# Altium PCB driver4ch.PcbDoc
Units mm, origin at the board's own origin, x right, y up, seen from the top; angles counter-clockwise.
Board outline 140 x 27.5 mm, 2 copper layers (Top Layer, Bottom Layer); 59 components, 34 nets, 158 pads, 0 vias.
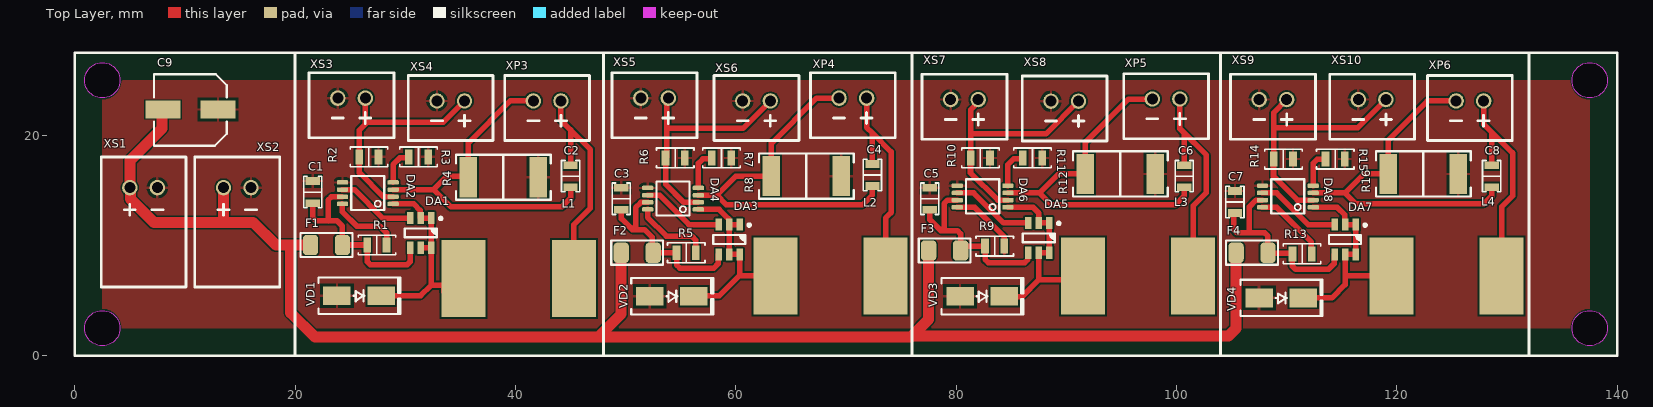
[diagram p0: Top Layer view]
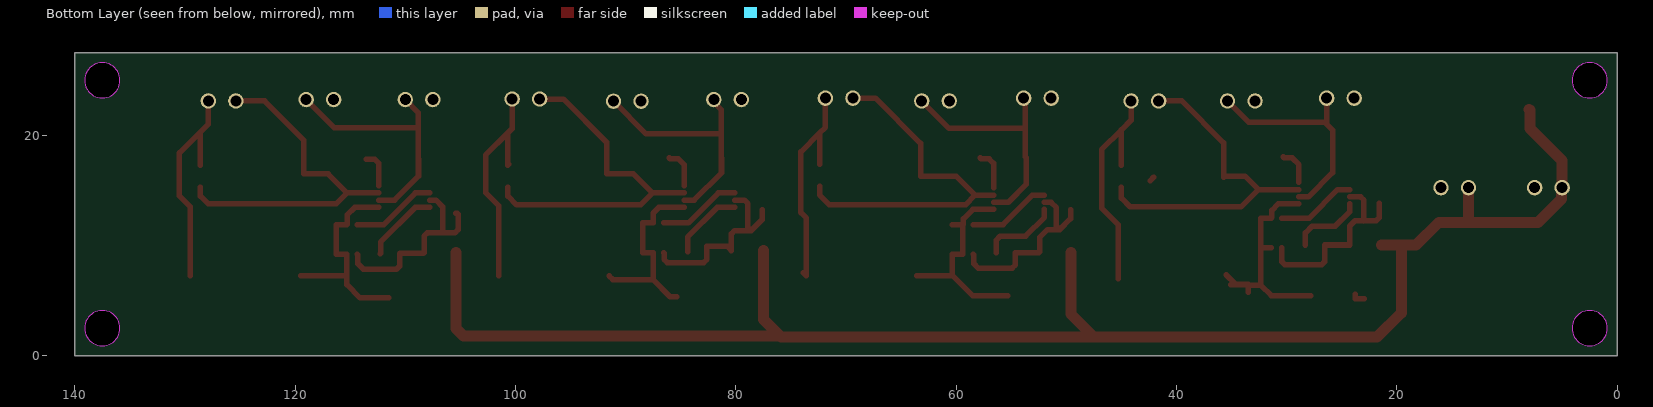
[diagram p1: Bottom Layer view, seen from below]
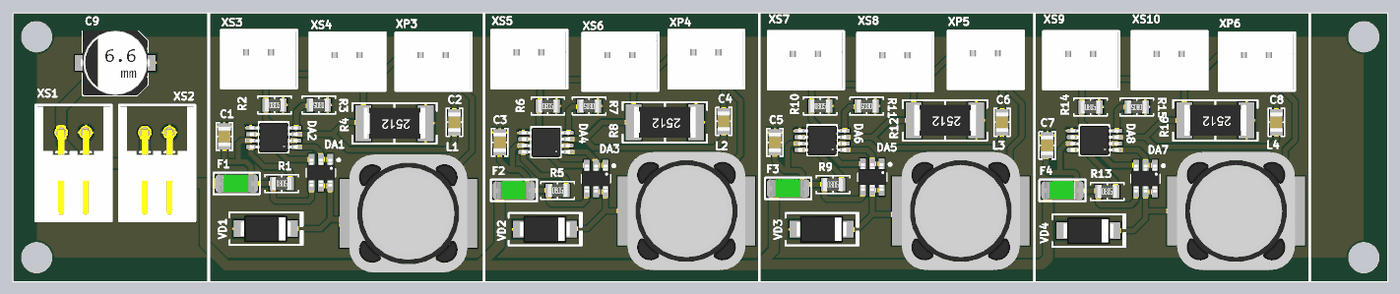
[diagram p2: 3D render of the assembled board from above, using the file's embedded part models]

## Layer stack, top to bottom
Top Solder: solder mask 0.0102, Solder Resist, Dk 3.5
Top Layer: signal copper 0.0356
Dielectric 1: dielectric 0.32, FR-4, Dk 4.8
Bottom Layer: signal copper 0.0356
Bottom Solder: solder mask 0.0102, Solder Resist, Dk 3.5

## Board outline
0,0 140,0 140,27.5 0,27.5
cut-out: 2.5,26.6 cw(c2.5,25) 4.1,25 cw(c4.1,25) 4.1,25 cw(c2.5,25) 2.5,23.4 cw(c2.5,25) 0.9,25 cw(c0.9,25) 0.9,25 cw(c2.5,25)
cut-out: 2.5,4.1 cw(c2.5,2.5) 4.1,2.5 cw(c4.1,2.5) 4.1,2.5 cw(c2.5,2.5) 2.5,0.9 cw(c2.5,2.5) 0.9,2.5 cw(c0.9,2.5) 0.9,2.5 cw(c2.5,2.5)
cut-out: 137.5,4.1 cw(c137.5,2.5) 139.1,2.5 cw(c139.1,2.5) 139.1,2.5 cw(c137.5,2.5) 137.5,0.9 cw(c137.5,2.5) 135.9,2.5 cw(c135.9,2.5) 135.9,2.5 cw(c137.5,2.5)
cut-out: 137.5,26.6 cw(c137.5,25) 139.1,25 cw(c139.1,25) 139.1,25 cw(c137.5,25) 137.5,23.4 cw(c137.5,25) 135.9,25 cw(c135.9,25) 135.9,25 cw(c137.5,25)

## Design rules (kind name [scope] priority, off if disabled: settings)
Clearance "Clearance 3 Oz" [All] p1: gap=0.15 ignorepadtopadclearanceinfootprint=FALSE
PolygonConnect [All] p1: connectstyle=Relief reliefconductorwidth=0.254 reliefentries=4 polygonreliefangle="90 Angle" airgapwidth=0.254
RoutingVias [All] p1: holewidth=0.711 width=1.27 viastyle="Through Hole" minholewidth=0.711 minwidth=1.27 maxholewidth=0.711 maxwidth=1.27
SolderMaskExpansion [All] p1: expansion=0.102 istentingtop=FALSE
Width "Width 3 Oz" [All] p1: maxlimit=10 minlimit=0.35 preferedwidth=0.5 minimp=50.000000 maximp=50.000000 favimp=50.000000 checkconnectedcopper=TRUE
30 further rules are at their usual default settings.

## Components (designator, comment, footprint, x,y, rotation, side; value= is the part's Value field where it differs from the comment)
C1 "2.2 µF" "CAP 0805_2012 RF" 21.6,14.85 r270 top
C2 "10 nF" "CAP 0805_2012 RF" 45,16.3 r90 top
C3 "2.2 µF" "CAP 0805_2012 RF" 49.6,14.25 r270 top
C4 "10 nF" "CAP 0805_2012 RF" 72.4,16.4 r90 top
C5 "2.2 µF" "CAP 0805_2012 RF" 77.6,14.25 r270 top
C6 "10 nF" "CAP 0805_2012 RF" 100.7,16.3 r90 top
C7 "2.2 µF" "CAP 0805_2012 RF" 105.3,13.95 r270 top
C8 "10 nF" "CAP 0805_2012 RF" 128.6,16.3 r90 top
C9 "10 µF" "CAP ALSMD 6.6MM H5.4MM" 10.5,22.35 r180 top
DA1 "FDC658AP" "TI TSOT-23-6" 31.4,11.15 r270 top
DA2 "LM3401" MSOP8 26.6,14.75 r180 top
DA3 "FDC658AP" "TI TSOT-23-6" 59.4,10.55 r270 top
DA4 "LM3401" MSOP8 54.3,14.25 r180 top
DA5 "FDC658AP" "TI TSOT-23-6" 87.5,10.7 r270 top
DA6 "LM3401" MSOP8 82.4,14.45 r180 top
DA7 "FDC658AP" "TI TSOT-23-6" 115.3,10.55 r270 top
DA8 "LM3401" MSOP8 110.1,14.45 r180 top
F1 "2 A" 1206_fusE 21.4,10.05 r0 top
F2 "2 A" 1206_fusE 49.6,9.35 r0 top
F3 "2 A" 1206_fusE 77.5,9.55 r0 top
F4 "2 A" 1206_fusE 105.4,9.35 r0 top
L1 "33 µH" INDUCTOR_1208 40.3,7 r0 top
L2 "33 µH" INDUCTOR_1208 68.6,7.25 r0 top
L3 "33 µH" INDUCTOR_1208 96.5,7.25 r0 top
L4 "33 µH" INDUCTOR_1208 124.5,7.25 r0 top
R1 "43 kΩ" "RES 0805_2012" 27.425,10.05 r0 top
R2 "100 kΩ" "RES 0805_2012" 26.7,18.05 r0 top
R3 "5.6 kΩ" "RES 0805_2012" 31.2,18.05 r180 top
R4 "0.3 Ω" "RES 2512_6432" 38.9,16.2 r180 top
R5 "43 kΩ" "RES 0805_2012" 55.5,9.35 r0 top
R6 "100 kΩ" "RES 0805_2012" 54.5,17.95 r0 top
R7 "5.6 kΩ" "RES 0805_2012" 58.7,17.95 r180 top
R8 "0.3 Ω" "RES 2512_6432" 66.4,16.3 r180 top
R9 "43 kΩ" "RES 0805_2012" 83.5,9.95 r0 top
R10 "100 kΩ" "RES 0805_2012" 82.2,17.95 r0 top
R11 "5.6 kΩ" "RES 0805_2012" 86.927,17.95 r180 top
R12 "0.3 Ω" "RES 2512_6432" 94.9,16.5 r180 top
R13 "43 kΩ" "RES 0805_2012" 111.4,9.25 r0 top
R14 "100 kΩ" "RES 0805_2012" 109.7,17.85 r0 top
R15 "5.6 kΩ" "RES 0805_2012" 114.4,17.85 r180 top
R16 "0.3 Ω" "RES 2512_6432" 122.4,16.5 r180 top
VD1 "SS34" "DO214AC SMA" 25.8,5.45 r0 top
VD2 "SS34" "DO214AC SMA" 54.2,5.4 r0 top
VD3 "SS34" "DO214AC SMA" 82.352,5.403 r0 top
VD4 "SS34" "DO214AC SMA" 109.5,5.25 r0 top
XP3 "WB-02" MW-2M 42.627,22.823 r270 top
XP4 "WB-02" MW-2M 70.373,23.077 r270 top
XP5 "WB-02" MW-2M 98.8,23 r270 top
XP6 "WB-02" MW-2M 126.373,22.823 r270 top
XS1 "WK-02R" CWF_2R 7.5,14.25 r270 top
XS2 "WK-02R" CWF_2R 16,14.25 r270 top
XS3 "WB-02" MW-2M 24.873,23.077 r270 top
XS4 "WB-02" MW-2M 33.873,22.823 r270 top
XS5 "WB-02" MW-2M 52.373,23.077 r270 top
XS6 "WB-02" MW-2M 61.627,22.823 r270 top
XS7 "2-pin socket" MW-2M 80.5,22.95 r270 top
XS8 "2-pin socket" MW-2M 89.6,22.8 r270 top
XS9 "2-pin socket" MW-2M 108.5,22.95 r270 top
XS10 "2-pin socket" MW-2M 117.5,22.95 r270 top

## Footprints (in the part's own frame and the unit in brackets; to place one, negate y for a bottom-side part, rotate by r counter-clockwise, add the part's x,y. Pads: shape width x height; smd on the part's side, far side on the other; paste and mask are expansions set on the pad)
1206_fusE [mm]
  rrect50% 1.4x1.85 smd: 1(0,0) 2(2.9,0)
  silkscreen extent -0.9,-1.1 3.8,1.1, body extent -0.35,-0.92 3.15,0.92, height 0.5
"CAP 0805_2012 RF" [mm] "Chip Capacitor, 2-Leads, Body 2.00x1.20mm, IPC High Density"
  rect 0.7x1.3 smd: 1(-1,0) 2(1,0)
  silkscreen extent -1.43,-0.82 1.43,0.82, body extent -1,-0.64 1,0.64, height 1.26
"CAP ALSMD 6.6MM H5.4MM" [mm] "Aluminum Electrolytic Capacitor, Body 6.60x6.60x5.40mm, IPC Low Density"
  rect 3.2x1.6 smd: 1(-2.5,0) 2(2.5,0)
  silkscreen extent -3.3,-3.2 3.3,3.3, body extent -3.5,-3.3 3.5,3.3, height 5.4
CWF_2R [mm]
  round 1.4 hole 1: 1(-1,-2.5) 2(-1,0)
  silkscreen extent -3.8,-5.1 8,2.6, body extent -3.62,-5 7.88,2.5, height 5.75
"DO214AC SMA" [mm] "Molded Diode, 2-Leads, Body 4.30x2.60mm, IPC Medium Density"
  rect 2.5x1.7 smd: 1(-2,0) 2(2,0)
  silkscreen extent -3.68,-1.65 3.75,1.65, body extent -2.6,-1.37 2.6,1.37, height 2.4
INDUCTOR_1208 [mm]
  rect 4x7 smd: 1(-5,0) 2(5,0)
  body extent -6,-6 6,6, height 7.46
MSOP8 [mm]
  rrect50% 1.02x0.41 smd: 1(-2.3,0.975) 2(-2.3,0.325) 3(-2.3,-0.325) 4(-2.3,-0.975) 5(2.3,-0.975) 6(2.3,-0.325) 7(2.3,0.325) 8(2.3,0.975)
  silkscreen extent -1.5,-1.57 1.5,1.53, body extent -2.46,-1.49 2.44,1.51, height 1.15
MW-2M [mm]
  round 1.4 hole 1: 1(-0.3,1.5) 2(-0.3,-1)
  silkscreen extent -2.6,-3.6 3.3,4.1, body extent -2.5,-3.55 3.2,3.95, height 7
"RES 0805_2012" [mm] "Chip Resistor, 2-Leads, Body 2.00x1.25mm, IPC Medium Density"
  rect 0.7x1.35 smd: 1(-0.875,0) 2(0.875,0)
  silkscreen extent -1.7,-0.9 1.7,0.9, body extent -1,-0.62 1,0.63, height 0.6
"RES 2512_6432" [mm] "Chip Resistor, 2-Leads, Body 6.30x3.15mm, IPC Medium Density"
  rect 1.6x3.65 smd: 1(-3.175,0) 2(3.175,0)
  silkscreen extent -4.3,-2.05 4.3,2.05, body extent -3.15,-1.57 3.15,1.57, height 0.7
"TI TSOT-23-6" [mm] "TSOT23, 6-Leads, Body 2.90x2.80mm, Pitch 0.95mm, IPC High Density"
  rrect1% 1.1x0.6 smd: 1(-1.35,0.95) 2(-1.35,0) 3(-1.35,-0.95) 4(1.35,-0.95) 5(1.35,0) 6(1.35,0.95)
  silkscreen extent -1.43,-1.45 0.4,1.94, body extent -1.4,-1.45 1.4,1.45, height 1.1

## Part data
C1 C3 C5 C7: library part C_NonPolarized, "Ceramic capacitor, 50 V, 10%"
C2 C4 C6 C8: library part C_NonPolarized, "Ceramic capacitor, 250 V, 10%"
C9: library part C_Polarized, "Aluminum electrolytic capacitor, 50 V, 20%"
DA1 DA3 DA5 DA7: library part VT_FDC658AP, "P-channel power MOSFET"
DA2 DA4 DA6 DA8: library part DA_LM3401, "Hysteretic LED driver controller"
F1 F2 F3 F4: library part F_Fuse, "Surface-mount fuse, 63 V"
L1 L2 L3 L4: library part L_Inductor, "Shielded power inductor, 15%"
R1 R2 R3 R5 R6 R7 R9 R10 R11 R13 R14 R15: library part R_Resistor, "Chip resistor, 0.125 W"
R4 R8 R12 R16: library part R_Resistor, "Current-sense resistor, 1 W, 1%"
VD1 VD2 VD3 VD4: library part VD_Schottky, "Schottky rectifier, 3 A, 40 V"
XP3 XP4 XP5 XP6: library part XP_Connector_2Pin, "2-pin connector (plug)"
XS1 XS2 XS3 XS4 XS5 XS6 XS7 XS8 XS9 XS10: library part XS_Connector_2Pin, "2-pin connector (socket)"

## Nets (pads, with @x,y where several pads share a name; then routed paths per layer and width w, separated by ;. In a path a pad name is that pad's centre, name@x,y a point inside that pad or via, vN(x,y) a via of type N, cw(c..) or ccw(c..) an arc to the next point about the centre after c; other vN are vias at no path point)
NetC1_1: C1.1 C3.1 C5.1 C7.1 C9.1 DA2.5 DA4.5 DA6.5 DA8.5 R2.2 R3.1 R4.1 R6.2 R7.1 R8.1 R10.2 R11.1 R12.1 R14.2 R15.1 R16.1 VD1.1 VD2.1 VD3.1 VD4.1 XS1.2 XS2.2 XS3.2 XS4.2 XS5.2 XS6.2 XS7.2 XS8.2 XS9.2 XS10.2 | length 1.9
  Top Layer w0.5: XS1.2 XS1.2@7.5,15.494 ; VD1.1@22.982,5.168 23.8,5.168 VD1.1 VD1.1@23.8,5.568 ; R4.1 R4.1@42.407,15.868
NetC1_2: C1.2 DA1.4 DA2.7 F1.2 R1.1 | length 18.5
  Top Layer w0.5: C1.2 21.6,12.543 21.893,12.25 22.996,12.25 ; DA2.7 23.293,14.425 23,14.132 23,12.254 22.996,12.25 ; DA1.4 30.45,8.543 30.157,8.25 26.843,8.25 26.55,8.543 R1.1 F1.2 24.3,11.75 23.8,12.25 22.996,12.25
NetC2_1: C2.1 DA2.3 R4.2 XP3.2 | length 32.4
  Top Layer w0.5: DA2.3 32.575,15.075 ; XP3.2 39.523,23.123 35.725,19.325 R4.2 35.625,16.3 33.8,16.3 32.575,15.075 ; C2.1 45,14.3 44.2,13.5 34.15,13.5 32.575,15.075
NetC2_2: C2.2 L1.2 XP3.1 | length 21.1
  Top Layer w0.5: XP3.1 44.127,21.373 45,20.5 ; C2.2 45,20.5 ; L1.2 45.3,11.9 46.8,13.4 46.8,18.7 45,20.5
NetC3_2: C3.2 DA3.4 DA4.7 F2.2 R5.1 | length 17.3
  Top Layer w0.5: C3.2 49.607,13.243 49.607,12.443 50.6,11.45 ; DA4.7 51.375,13.925 50.9,13.45 50.9,11.75 50.6,11.45 ; DA3.4 58.4,9.15 58.4,8.35 58,7.95 54.918,7.95 54.625,8.243 R5.1 F2.2 52.418,9.432 52.418,10.732 51.7,11.45 50.6,11.45
NetC4_1: C4.1 DA4.3 R8.2 XP4.2 | length 33.8
  Top Layer w0.5: DA4.3 58.275,14.575 ; XP4.2 67.327,23.377 63.225,19.275 R8.2 60,16.3 58.275,14.575 ; C4.1 72.393,15.393 72.393,14.593 71.5,13.7 59.15,13.7 58.275,14.575
NetC4_2: C4.2 L2.2 XP4.1 | length 20.5
  Top Layer w0.5: XP4.1 71.873,20.727 72.4,20.2 ; C4.2 72.4,20.2 ; L2.2@73.9,7.55 L2.2 73.6,12.5 74.1,13 74.1,18.5 72.4,20.2
NetC5_2: C5.2 DA5.4 DA6.7 F3.2 R9.1 | length 18
  Top Layer w0.5: C5.2 77.6,12.35 78.6,11.35 ; DA6.7 79.225,14.125 78.9,13.8 78.9,11.65 78.6,11.35 ; DA5.4 86.5,9.3 86.5,8.743 86.207,8.45 82.918,8.45 82.625,8.743 R9.1 80.8,9.95 F3.2 80.4,11.057 80.107,11.35 78.6,11.35
NetC6_1: C6.1 DA6.3 R12.2 XP5.2 | length 33
  Top Layer w0.5: DA6.3 87.575,14.775 ; XP5.2 95.65,23.3 91.725,19.375 R12.2 89.3,16.5 87.575,14.775 ; C6.1 100.693,15.293 100.693,14.493 99.9,13.7 88.65,13.7 87.575,14.775
NetC6_2: C6.2 L3.2 XP5.1 | length 20.6
  Top Layer w0.5: XP5.1 100.3,20.6 100.7,20.2 ; C6.2@100.6,17.4 C6.2 100.7,20.2 ; L3.2 101.5,13.6 102.7,14.8 102.7,18.2 100.7,20.2
NetC7_2: C7.2 DA7.4 DA8.7 F4.2 R13.1 | length 18.7
  Top Layer w0.5: C7.2@105.4,12.95 C7.2 105.2,12.85 105.2,11.443 105.493,11.15 106.6,11.15 ; DA8.7 107.225,14.125 106.6,13.5 106.6,11.15 ; DA7.4 114.3,9.15 114.3,8.35 113.8,7.85 110.796,7.85 110.504,8.143 110.504,9.271 110.475,9.3 108.35,9.3 F4.2 108.3,10.857 108.007,11.15 106.6,11.15
NetC8_1: C8.1 DA8.3 R16.2 XP6.2 | length 33.1
  Top Layer w0.5: DA8.3 115.275,14.775 ; XP6.2 122.773,23.123 119.225,19.575 R16.2 117,16.5 115.275,14.775 ; C8.1 128.593,15.293 128.593,14.493 127.9,13.8 116.25,13.8 115.275,14.775
NetC8_2: C8.2 L4.2 XP6.1 | length 20.3
  Top Layer w0.5: XP6.1 127.873,21.027 128.65,20.25 ; C8.2 128.6,20.2 128.65,20.25 ; L4.2 129.5,13.5 130.5,14.5 130.5,18.4 128.65,20.25
NetC9_2: C9.2 F1.1 F2.1 F3.1 F4.1 XS1.1 XS2.1 | length 147.6
  Top Layer w1: C9.2 7.936,22.286 7.936,20.636 5,17.7 XS1.1 5.077,15.173 5.077,14.223 7.2,12.1 16.2,12.1 18.25,10.05 19.4,10.05 ; 13.5,12.1 XS2.1 ; F1.1 19.4,10.05 ; F2.1 49.6,3.786 47.514,1.7 ; F3.1 77.5,3.3 76,1.8 ; F4.1 105.4,2.486 104.714,1.8 76,1.8 ; 19.4,10.05 19.6,9.85 19.6,3.9 21.8,1.7 47.514,1.7 ; 47.514,1.7 75.9,1.7 76,1.8
NetDA1_1: DA1.1 DA1.2 DA1.5 DA1.6 DA2.1 L1.1 VD1.2 | length 22.9
  Top Layer w0.5: VD1.2 31.4,5.45 32.343,6.393 L1.1@33.5,6.393 ; DA2.1 30.775,13.775 31.35,13.2 31.35,12.55 DA1.2 DA1.1 DA1.6 ; DA1.5 DA1.6 ; 32.35,6.393 DA1.6 ; L1.1@33.5,5.743 33.5,6.45 L1.1@34.643,6.45 ; L1.1@33.5,6.493 33.9,6.493 34.643,6.493 L1.1@35.5,7.35 ; L1.1@33.9,6.45 L1.1@34.643,6.45 ; L1.1@35.1,6.45 L1.1@34.643,6.45
NetDA1_3: DA1.3 DA2.6 | length 7.2
  Top Layer w0.5: DA2.6 25.375,15.075 27.95,12.5 DA1.3
NetDA2_2: DA2.2 R2.1 XS3.1 XS4.1 | length 20.6
  Top Layer w0.5: XS3.1 26.373,21.022 25.825,20.474 R2.1 25.825,16.625 28.025,14.425 DA2.2 ; 26.525,21.175 33.425,21.175 XS4.1
NetDA2_4: DA2.4 R3.2 | length 3.3
  Top Layer w0.5: DA2.4 28.9,17.35 29.518,17.968 30.243,17.968 R3.2
NetDA2_8: DA2.8 R1.2 | length 6.6
  Top Layer w0.5: DA2.8 24.3,13.05 25.6,11.75 27.7,11.75 28.307,11.143 28.307,10.057 R1.2
NetDA3_1: DA3.1 DA3.2 DA3.5 DA3.6 DA4.1 L2.1 VD2.2 | length 19.2
  Top Layer w0.5: VD2.2@55.3,5.45 58.5,5.45 60.3,7.25 L2.1 ; DA4.1 58.489,13.275 59.35,12.414 59.35,11.95 DA3.2 ; 60.35,7.25 DA3.6 DA3.5 DA3.2 ; DA3.1 DA3.2
NetDA3_3: DA3.3 DA4.6 | length 7.6
  Top Layer w0.5: DA4.6 53.075,14.575 55.75,11.9 DA3.3
NetDA4_2: DA4.2 R6.1 XS5.1 XS6.1 | length 22
  Top Layer w0.5: XS5.1 53.725,23.229 53.725,20.64 ; DA4.2 55.275,13.925 53.625,15.575 R6.1 53.725,18.05 53.725,20.64 ; XS6.1 60.644,20.64 53.725,20.64
NetDA4_4: DA4.4 R7.2 | length 3.7
  Top Layer w0.5: DA4.4 56.6,17.45 57.018,17.868 57.743,17.868 R7.2
NetDA4_8: DA4.8 R5.2 | length 7.1
  Top Layer w0.5: DA4.8 52,12.55 53.7,10.85 56,10.85 56.375,10.475 R5.2
NetDA5_1: DA5.1 DA5.2 DA5.5 DA5.6 DA6.1 L3.1 VD3.2 | length 17.9
  Top Layer w0.5: DA6.1 86.975,13.475 87.496,12.954 87.496,12.054 DA5.2 DA5.1 DA5.6 DA5.5 87.5,6.899 ; VD3.2@85.364,5.35 85.951,5.35 87.5,6.899 ; L3.1 91.149,6.899 87.5,6.899
NetDA5_3: DA5.3 DA6.6 | length 7.6
  Top Layer w0.5: DA6.6 81.575,14.775 84.3,12.05 DA5.3
NetDA6_2: DA6.2 R10.1 XS7.1 XS8.1 | length 22.4
  Top Layer w0.5: XS7.1 82,23.006 81.325,22.331 81.325,20.141 ; DA6.2 83.775,14.125 81.3,16.6 81.3,17.925 R10.1 81.325,20.141 ; XS8.1 88.141,20.141 81.325,20.141
NetDA6_4: DA6.4 R11.2 | length 3.5
  Top Layer w0.5: DA6.4 84.7,17.35 85.212,17.862 85.964,17.862 R11.2
NetDA6_8: DA6.8 R9.2 | length 6.7
  Top Layer w0.5: DA6.8 81.675,13.475 84.375,10.775 R9.2@84.375,9.45
NetDA7_1: DA7.1 DA7.2 DA7.5 DA7.6 DA8.1 L4.1 VD4.2 | length 19.9
  Top Layer w0.5: VD4.2 114.1,5.25 115.3,6.45 115.3,7.25 ; DA8.1 114.575,13.475 115.271,12.779 115.271,11.929 DA7.2 DA7.1 DA7.6 DA7.5 115.3,7.25 ; L4.1 115.3,7.25
NetDA7_3: DA7.3 DA8.6 | length 7.7
  Top Layer w0.5: DA8.6 109.075,14.775 111.95,11.9 DA7.3
NetDA8_2: DA8.2 R14.1 XS9.1 XS10.1 | length 23.2
  Top Layer w0.5: XS9.1 108.825,22.075 108.825,20.7 ; DA8.2 110.975,14.125 108.8,16.3 108.8,17.825 R14.1 108.825,20.7 ; XS10.1 116.45,20.7 108.825,20.7
NetDA8_4: DA8.4 R15.2 | length 3.3
  Top Layer w0.5: DA8.4 112.4,17.457 112.793,17.85 R15.2
NetDA8_8: DA8.8 R13.2 | length 6.8
  Top Layer w0.5: DA8.8 109.075,13.475 112.245,10.305 112.245,9.28 R13.2

## Polygon pours and split planes (outlines as drawn)
NetC1_1 on Top Layer "NETC1_1_L01_P000" (solid, pour order 0): 2.5,25 2.5,2.5 137.5,2.5 137.5,25

## Silkscreen, mask and mechanical layers (free items; w line width, h text height)
Top Overlay:
  lines w0.254: 20,0 0,0 0,27.5 20,27.5 ; 20,0 20,27.5 ; 20,0 48,0 ; 20,0 20,27.5 ; 20,27.5 48,27.5 ; 48,0 48,27.5 ; 48,0 76,0 ; 48,0 48,27.5 ; 48,27.5 76,27.5 ; 76,0 104,0 ; 76,0 76,27.5 ; 76,0 76,27.5 ; 76,27.5 104,27.5 ; 104,0 104,27.5 ; 104,0 132,0 ; 104,0 104,27.5 ; 104,27.5 132,27.5 ; 132,0 132,27.5 ; 132,0 140,0 140,27.5 132,27.5 ; 132,0 132,27.5
Mechanical 1:
  circle w0.254: c2.5,25 r1.6
  circle w0.254: c2.5,2.5 r1.6
  circle w0.254: c137.5,2.5 r1.6
  circle w0.254: c137.5,25 r1.6